# Altium PCB PCB_GTV3.3.PcbDoc (part 9 of 11)
Units mil, origin at the board's own origin, x right, y up, seen from the top; angles counter-clockwise.
Board outline 8070.87 x 4881.89 mil, 4 copper layers (Top Layer, GND, PWR, Bottom Layer), stack 61.653 mil thick; 464 components, 293 nets, 1458 pads, 748 vias.
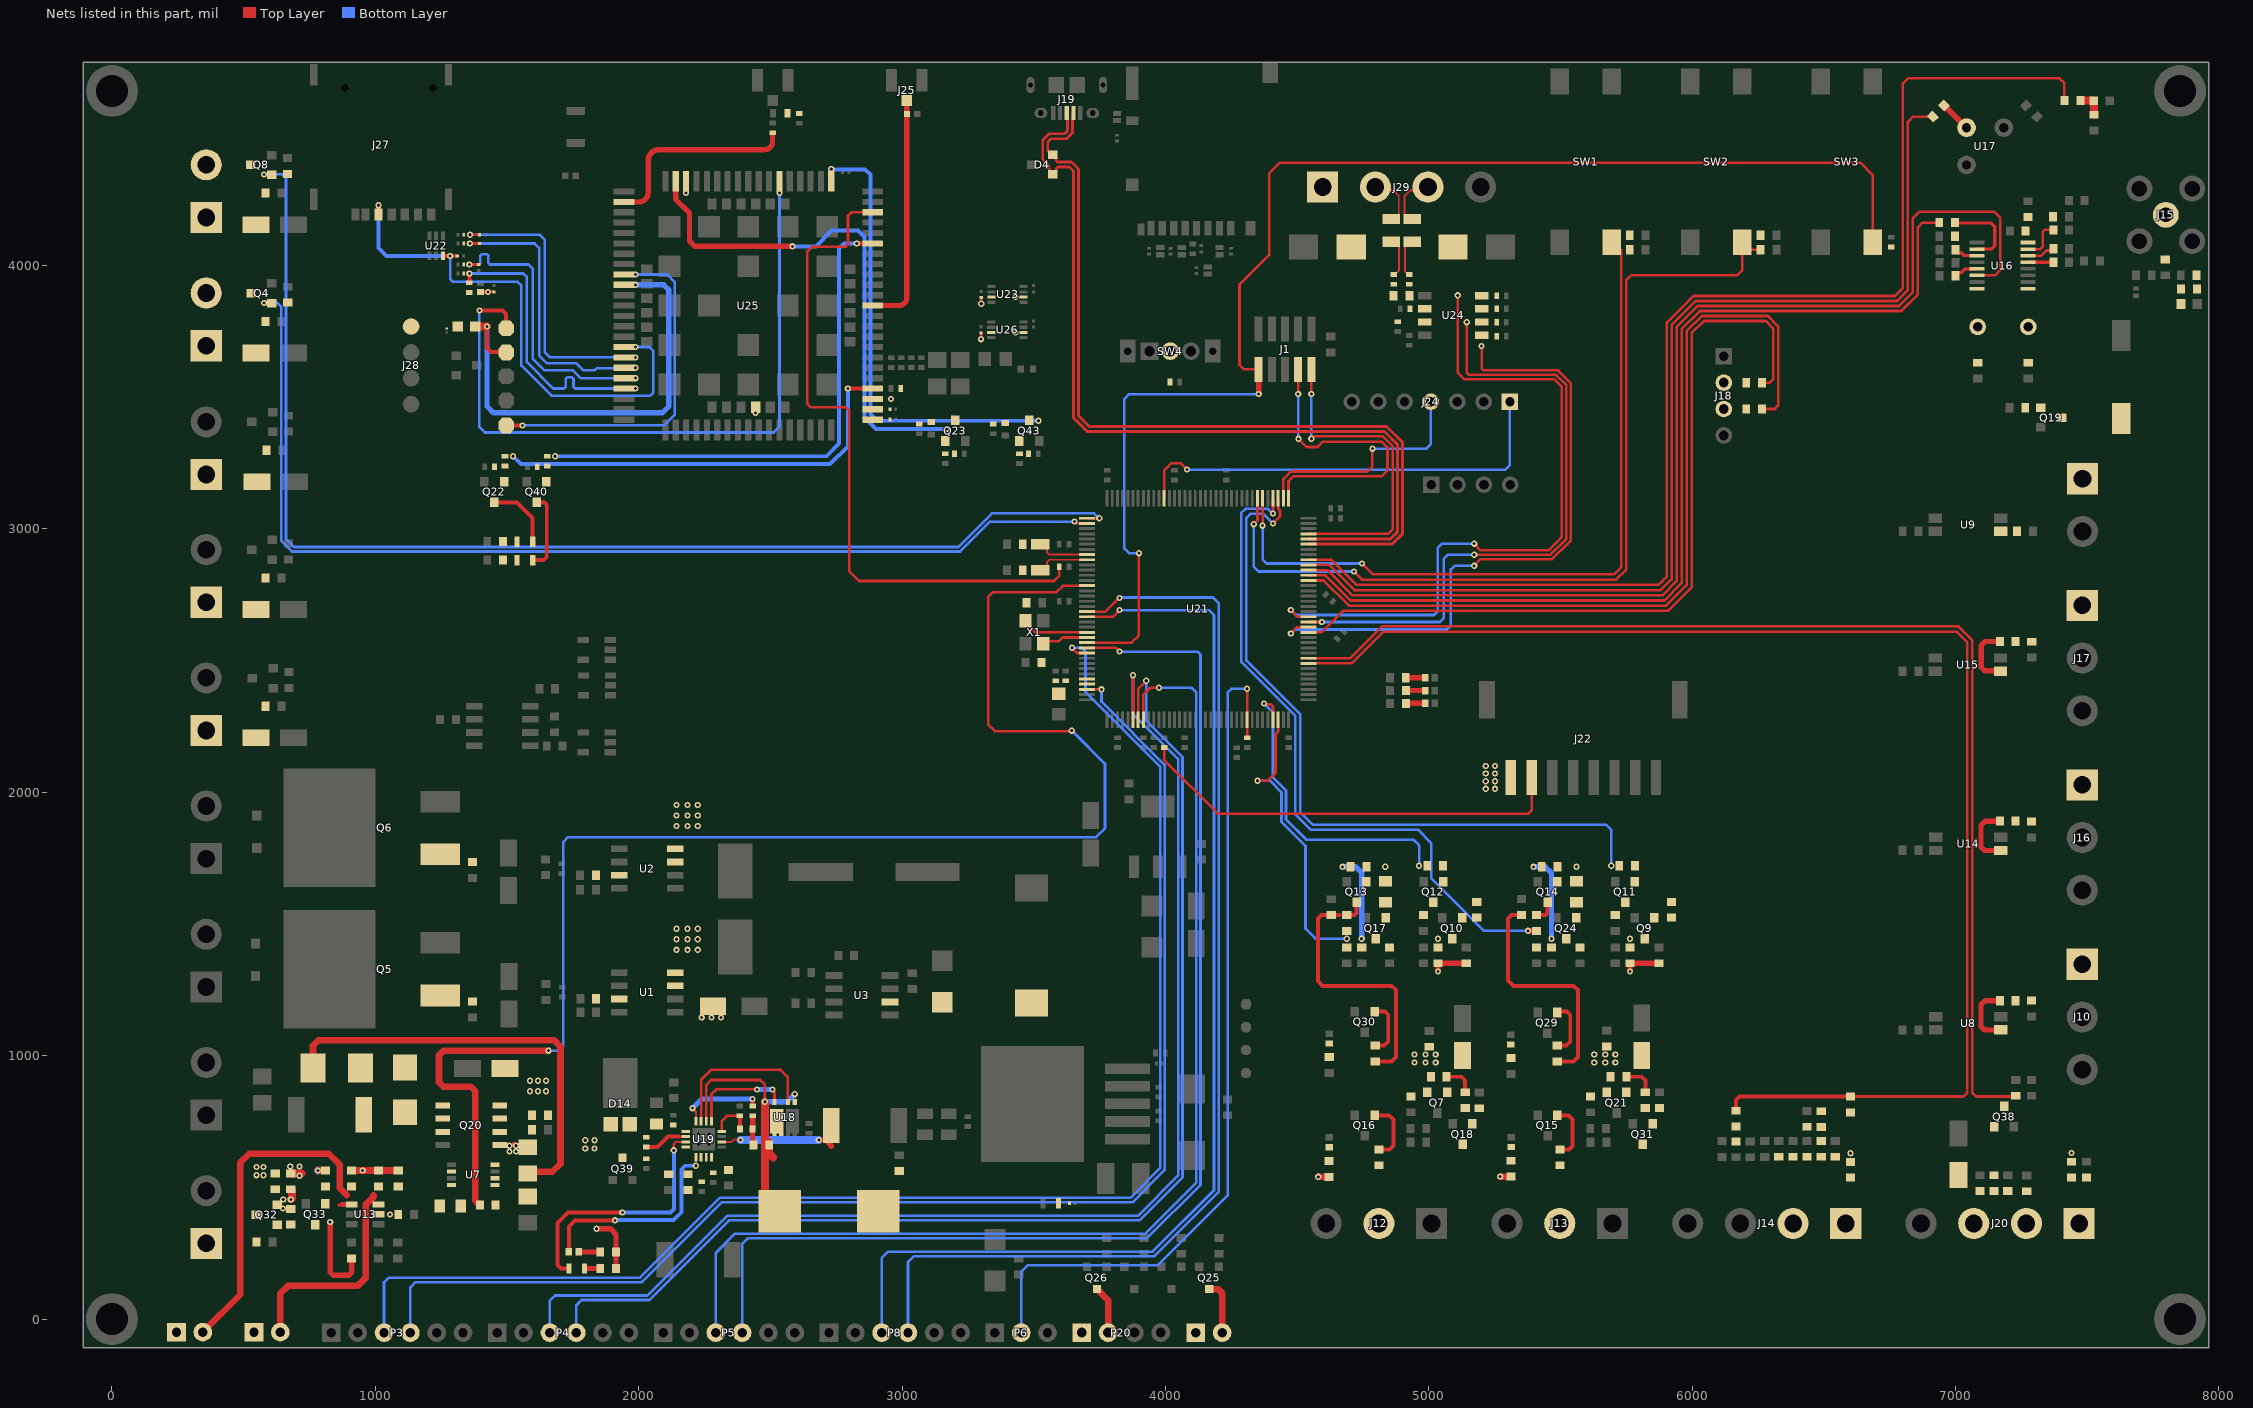
[diagram p6: the nets of this part, all layers, seen from the top]

## Via types
v1: diameter 23.62, hole 11.81, Top Layer to Bottom Layer, tented both sides, 422 vias
v2: diameter 23.62, hole 11.81, Top Layer to Bottom Layer, 326 vias

## Nets (pads, with @x,y where several pads share a name; then routed paths per layer and width w, separated by ;. In a path a pad name is that pad's centre, name@x,y a point inside that pad or via, vN(x,y) a via of type N, cw(c..) or ccw(c..) an arc to the next point about the centre after c; other vN are vias at no path point) (continued)
NetC70_1: C70.1 U16.13 | length 94
  Top Layer w12: C70.1@6998.87,3961.03 6998.87,3963.53 7007.87,3972.53 7021.13,3972.53 7036.13,3987.53 U16.13@7080.43,3987.53
NetC77_2: C77.2 SB16.1
NetC79_2: C79.2 R114.1 R115.2
NetC80_1: C80.1 D15.1 U19.12 | length 167.2
  Top Layer w10: U19.12@2315.54,712.36 2315.54,752.76 2334.32,771.53 C80.1@2383.87,771.53 C80.1@2384.5,770.91 ; D15.1@2384.5,721.99 D15.1@2385.12,721.36
  Top Layer w15: D15.1@2384.5,721.99 C80.1@2384.5,770.91
NetC81_2: C81.2 R119.2 U19.1
NetC82_1: C82.1 D15.2 R121.2 | length 104.1
  Top Layer w20: R121.2@2432.75,763.17 2432.56,762.98 2432.56,721.55 D15.2@2432.37,721.36 2432.37,664.05 C82.1@2435.75,660.67
NetC87_1: C87.1 L5.2 R120.2 U19.10 | length 499
  Top Layer w8: U19.10@2315.54,672.99 2352.86,672.99 2361.07,681.19 2385.18,681.19 v2(2386.82,679.56)
  Top Layer w10: R120.2@2704.3,678.11 2730.79,704.61 R120.2@2730.79,734.67
  Top Layer w20: v2(2683.9,679.56) 2709.3,679.56 2730.79,658.06 2730.79,654.82
  Bottom Layer w30: v2(2386.82,679.56) v2(2683.9,679.56)
NetC96_1: C96.1 U25.90 | length 779.9
  Top Layer w20: U25.90@1943.82,4241.74 2000.59,4241.74 ccw(c2000.59,4277.02) 2014.37,4244.54 ccw(c2000.59,4277.02) 2033.06,4263.23 ccw(c2000.59,4277.02) 2035.87,4277.02 2035.87,4398.49 cw(c2077.5,4398.49) 2077.5,4440.13 2477.87,4440.13 ccw(c2477.87,4470.39) 2508.13,4470.39 C96.1@2508.13,4503.29
NetD1_1: D1.1 L2.1 U3.2
NetD5_2: D5.2 F2.1 R63.2 | length 154.1
  Top Layer w7: F2.1@4857.92,4090.24 4870.81,4090.24 4887,4074.05 4887,3982.37 4870.67,3966.03 R63.2@4867.17,3966.03
NetD6_2: D6.2 D7.2
NetD8_2: D8.2 F3.1 R87.2 | length 152.9
  Top Layer w7: R87.2@4925.54,3966.03 4922.04,3966.03 4909.07,3979 4909.07,4075.55 4923.76,4090.24 F3.1@4937.54,4090.24
NetD17_2: D17.2 F1.2 J28.1
NetJ14_1: J14.1 SB5.2
NetJ14_2: J14.2 SB35.2 SB36.2
NetJ15_1: J15.1 SB4.2
NetJ18_2: J18.2 SB19.2
NetJ18_3: J18.3 SB20.2
NetJ20_2: J20.2 R21.1
NetL6_1: L6.1 R143.2
NetLED1_2: LED1.2 R14.2 | length 73.7
  Top Layer w12: R14.2@4912.36,2435.03 R14.2@4912.79,2434.6 ; LED1.2@4985.23,2434.6 LED1.2@4985.66,2434.16
  Top Layer w20: R14.2@4912.79,2434.6 LED1.2@4985.23,2434.6
NetLED2_2: LED2.2 R15.2 | length 72.9
  Top Layer w12: R15.2@4912.86,2386.27 R15.2@4912.94,2386.18 ; LED2.2@4985.58,2386.18 LED2.2@4985.66,2386.1
  Top Layer w20: R15.2@4912.94,2386.18 LED2.2@4985.58,2386.18
NetLED3_2: LED3.2 R17.2 | length 73
  Top Layer w10: R17.2@4912.86,2337.5 R17.2@4913.39,2338.03
  Top Layer w20: R17.2@4913.39,2338.03 LED3.2@4985.66,2338.03
NetLED4_1: LED4.1 R50.1
NetLED5_1: LED5.1 R51.1
NetLED6_1: LED6.1 R93.1
NetLED7_1: LED7.1 R94.1
NetLED8_2: LED8.2 R53.2 SB3.1 | length 96.3
  Top Layer w30: SB3.1@7477.87,4628.03 7479.51,4626.4 LED8.2@7525.45,4626.4 ; R53.2@7525.38,4572.53 LED8.2@7525.38,4620.55
NetLED9_1: LED9.1 R126.1 | length 59.5
  Top Layer w20: LED9.1@1794.4,192.03 R126.1@1853.87,192.03
NetLED9_2: LED9.2 U19.3 | length 968.1
  Top Layer w8: v2(2133.25,640.7) 2133.25,665.32 2140.91,672.99 U19.3@2177.75,672.99
  Top Layer w15: LED9.2@1735.34,192.03 1704.87,192.03 1690.87,206.03 1690.87,364.03 1731.5,404.67 v2(1937.9,404.67)
  Bottom Layer w15: v2(1937.9,404.67) 2120.12,404.67 2133.25,417.79 v2(2133.25,640.7)
NetLED10_1: LED10.1 R128.1 | length 81.3
  Top Layer w20: LED10.1@1772.57,255.03 R128.1@1853.87,255.03
NetLED10_2: LED10.2 U19.5 | length 769
  Top Layer w7: v2(2216.97,582.06) v2@2217.05,582.13 ; U19.5@2217.05,613.86 U19.5@2217.12,613.93
  Top Layer w15: LED10.2@1735.17,255.03 1735.17,351.7 1758.42,374.95 v2(1909.69,374.95)
  Bottom Layer w15: v2(1909.69,374.95) 1910.1,375.36 2131.45,375.36 2161.67,405.58 2161.67,567.62 2176.11,582.06 v2(2216.97,582.06)
NetLED11_1: LED11.1 R132.1
NetLED12_1: LED12.1 R137.1
NetLED12_2: LED12.2 Q40.3 | length 299.4
  Top Layer w15: LED12.2@1597.4,2881.6 1638.43,2881.6 1650.87,2894.03 1650.87,3092.24 1642.08,3101.03 Q40.3@1611.98,3101.03
NetLED13_1: LED13.1 R145.1
NetLED13_2: LED13.2 Q22.3 | length 260.6
  Top Layer w15: Q22.3@1451.22,3101.03 1538.34,3101.03 1597.4,3041.97 LED13.2@1597.4,2952.03
NETLIGHT: R141.1 U25.52 | length 1625.9
  Top Layer w10: v1(2794,3533) v1@2794.04,3533.04 ; U25.52@2888.67,3533.04 U25.52@2888.7,3533.07
  Top Layer w15: v1@2794.04,3533.04 U25.52@2888.67,3533.04
  Bottom Layer w15: v2(1522.87,3275.9) 1552.73,3246.03 2726.97,3246.03 2794,3313.06 v1(2794,3533)
NetLS1_2: LS1.2 Q19.3
NetQ5_1: Q5.1 R24.1
NetQ6_1: Q6.1 R25.1
NetQ7_1: Q7.1 R27.1 R29.1 | length 120.8
  Top Layer w15: R27.1@5067.64,920.03 5123.87,920.03 5137.87,906.03 R29.1@5137.87,861.31
NetQ9_1: Q9.1 R42.1
NetQ10_1: Q10.1 R44.1
NetQ11_1: Q11.1 R46.1
NetQ11_3: Q11.3 R42.2 R43.1
NetQ12_1: Q12.1 R47.1
NetQ12_3: Q12.3 R44.2 R45.1
NetQ13_1: Q13.1 R52.1
NetQ14_1: Q14.1 R56.1
NetQ15_1: Q15.1 R89.2 | length 224.2
  Top Layer w15: Q15.1@5481.27,773.62 5530.1,773.62 5545.28,758.45 5545.28,657.61 5531.7,644.03 R89.2@5497.87,644.03
NetQ16_1: Q16.1 R90.2 | length 236.9
  Top Layer w15: Q16.1@4794.27,773.62 4848.83,773.62 4865.48,756.97 4865.48,658.94 4850.58,644.03 R90.2@4810.87,644.03
NetQ17_1: Q17.1 R95.1 R97.1
NetQ17_3: Q17.3 R52.2 R86.2 | length 333.1
  Bottom Layer w20: v2(4672.32,1717.03) 4723.87,1717.03 4744.87,1696.03 v2(4744.87,1444.19)
NetQ18_1: Q18.1 R28.2
NetQ18_3: Q18.3 R29.2
NetQ19_1: Q19.1 R62.1
NetQ21_1: Q21.1 R68.1 R107.1 | length 120.8
  Top Layer w15: R68.1@5751.64,920.03 5807.87,920.03 5821.87,906.03 R107.1@5821.87,861.31
NetQ22_1: Q22.1 R141.2 R142.2
NetQ23_1: Q23.1 R154.2 R155.2
NetQ24_1: Q24.1 R96.1 R98.1
NetQ24_3: Q24.3 R56.2 R88.2 | length 327.7
  Bottom Layer w20: v2(5397.06,1717.03) 5442,1717.03 5465.87,1693.17 v2(5465.87,1444.19)
NetQ29_1: Q29.1 R99.2 | length 213.5
  Top Layer w15: Q29.1@5485.27,1167.62 5524.31,1167.62 5536.87,1155.07 5536.87,1054.03 5520.87,1038.03 R99.2@5487.87,1038.03
NetQ30_1: Q30.1 R100.2 | length 213.5
  Top Layer w15: Q30.1@4794.27,1167.62 4833.31,1167.62 4845.87,1155.07 4845.87,1054.03 4829.87,1038.03 R100.2@4796.87,1038.03
NetQ31_1: Q31.1 R33.2
NetQ31_3: Q31.3 R107.2
NetQ32_1: Q32.1 Q33.3 R71.2
NetQ33_1: Q33.1 R81.2
NetQ38_1: Q38.1 R22.1
NetQ39_3: Q39.3 R123.1 R125.2 U19.2 | length 165.1
  Top Layer w8: 2150.62,692.74 U19.2@2177.68,692.74
  Top Layer w15: R123.1@2028.87,653.53 2071.87,653.53 2111.07,692.74 2150.62,692.74
NetQ40_1: Q40.1 R138.2 R139.2
NetQ43_1: Q43.1 R146.1 R147.2
NetR5_1: R5.1 U1.7
NetR8_1: R8.1 U2.7
NetR16_2: R16.2 SW4.2
NetR37_1: R37.1 U14.1 | length 240.8
  Top Layer w20: R37.1@7167.84,1889.82 7111.87,1889.82 7096.87,1874.82 7096.87,1792.03 7109.98,1778.92 U14.1@7172.25,1778.92
NetR39_1: R39.1 U15.1 | length 240.8
  Top Layer w20: R39.1@7168.05,2572.49 7112.08,2572.49 7097.08,2557.49 7097.08,2474.7 7110.19,2461.59 U15.1@7172.46,2461.59
NetR61_1: R61.1 R63.1 R108.1 U24.7
NetR78_1: R78.1 U8.1 | length 240.8
  Top Layer w20: R78.1@7167.84,1208.82 7111.87,1208.82 7096.87,1193.82 7096.87,1111.03 7109.98,1097.92 U8.1@7172.25,1097.92
NetR80_1: R80.1 U9.1
NetR87_1: R87.1 R106.2 R108.2 U24.6
NetR111_1: R111.1 SB37.1
NetR112_2: R112.2 R113.2 R114.2
NetR115_1: R115.1 SB38.1
NetR116_1: R116.1 U17.2 | length 120.4
  Top Layer w22: R116.1@6956.05,4607.62 6956.69,4607.62 7040.92,4523.4 U17.2@7041.56,4523.4
NetR121_1: R121.1 U19.16 | length 322.8
  Top Layer w7: R121.1@2432.44,809.48 R121.1@2432.75,809.17
  Top Layer w8: v2(2204.52,800.67) 2204.52,800.58 2216.92,788.18 U19.16@2216.92,751.92
  Top Layer w15: R121.1@2432.44,809.48 v2(2432.44,835.54)
  Bottom Layer w20: v2(2204.52,800.67) 2239.39,835.54 v2(2432.44,835.54)
NetR122_1: R122.1 R124.1 U19.4
NetR127_1: R127.1 R129.2 U19.8
NetR134_1: R134.1 U25.98 | length 2585.7
  Top Layer w10: U25.98@2888.7,4202.37 2808.17,4202.37 2794.9,4189.09 2794.9,4081.5 2784.34,4070.94 2657.86,4070.94 2640.24,4053.33 2640.24,3474.44 2652.48,3462.21 2785.07,3462.21 2800,3447.28 2800,2838.95 2836.82,2802.13 3576.23,2802.13 3596.86,2822.75 R134.1@3596.86,2856.36
NetR135_1: R135.1 U25.96
NetR140_1: R140.1 U25.95
NetSB7_1: SB7.1 U7.5 | length 3.2
  Top Layer w10: SB7.1@1454.75,435.63 SB7.1@1456.98,433.4
NetSB17_2: SB17.2 U16.5 | length 95.8
  Top Layer w12: U16.5@7275.31,4012.53 U16.5@7275.31,4012.53 7371.02,4012.59 SB17.2@7371.07,4012.64
NetSB18_1: SB18.1 U16.10 | length 302.8
  Top Layer w12: SB18.1@6997.87,4162.03 7134.55,4162.03 7148.87,4147.71 7148.87,4075.7 7135.7,4062.53 U16.10@7080.43,4062.53
NetU18_2: U18.2 U19.15 | length 607.1
  Top Layer w10: U19.15@2236.8,751.73 2236.98,751.9 2236.98,908.64 2274.49,946.16 2538.94,946.16 2565.75,919.34 U18.2@2565.75,824.67
NetU18_4: U18.4 U19.13 | length 391.7
  Top Layer w10: U19.13@2276.17,751.73 2276.17,853.77 2294.44,872.03 v2(2448.87,872.03) ; v2(2507.69,872.03) 2507.69,868.35 2515.57,860.47 U18.4@2515.57,824.67
  Bottom Layer w20: v2(2448.87,872.03) v2(2507.69,872.03)
NRST: C73.2 J1.10 SW3.3 U21.25 | length 5198.2
  Top Layer w10: U21.25@3702.4,2568.08 3871.29,2568.08 3899,2595.79 v1(3899,2908) ; J1.10@4353.87,3606.03 4298.41,3606.03 4281.29,3623.15 4281.29,3927.23 4394,4039.93 4394,4348.82 4435.76,4390.58 6639.42,4390.58 6685.4,4344.6 SW3.3@6685.4,4088.44
  Top Layer w20: v2(4353.87,3511.85) J1.10@4353.87,3606.03
  Bottom Layer w10: v1(3899,2908) 3861.78,2908 3843.85,2925.93 3843.85,3493.5 3862.19,3511.85 v2(4353.87,3511.85)
OSC_IN: C53.2 U21.8 X3.1 | length 240.8
  Top Layer w7: X3.1@3501.22,2941.31 3533.58,2941.31 3549.77,2925.12 3549.77,2911.57 3558.61,2902.73 U21.8@3702.4,2902.73 ; X3.1@3524,2941.31 X3.1@3539.75,2941.31
OSC_OUT: C78.2 U21.9 X3.2 | length 219.5
  Top Layer w7: X3.2@3524,2842.88 X3.2@3539.75,2842.88 ; X3.2@3524.59,2842.88 3534.48,2842.88 3550.67,2859.07 3550.67,2874.88 3558.83,2883.04 U21.9@3702.4,2883.04
OV_UV_EN: R81.1 R82.2 R117.1 R118.1 | length 206.4
  Top Layer w25: v2(782.02,563.98) R81.1@811.04,563.96 ; R117.1@909.82,563.96 v2(951.87,563.96) R118.1@1012.18,563.96 R82.2@1087.14,563.96
PATCH: C77.1 L4.1
PH: C82.2 L5.1 U18.1 U18.5 U19.14 | length 992.5
  Top Layer w10: U19.14@2256.49,751.73 2256.49,889.45 2274.66,907.62 2460.91,907.62 2478.82,889.7 v2(2478.82,825.3)
  Top Layer w30: L5.1@2478.82,460.03 v2(2478.82,825.3) ; C82.2@2495.75,670.36 C82.2@2495.75,660.67 2495.75,628.66 2510.95,613.46
  Bottom Layer w20: v2@2478.78,825.26 2563.95,825.26 v2@2591.86,853.17
  other v2: 2592.56,853.87
PIR_OUT: R116.2 U21.99 | length 4093.6
  Top Layer w10: U21.99@4543.34,2863.36 4621.95,2863.36 4717.7,2767.61 4764.74,2767.61 5879.49,2767.61 5921.87,2809.98 5921.87,3774.5 6012.87,3865.51 6777.91,3865.51 6818.98,3906.58 6818.98,4545.15 6839.03,4565.2 R116.2@6913.63,4565.2
PM_CNTRL: Q4.1 R6.1 U21.2 | length 4085.5
  Top Layer w10: v1(3654.25,3027.96) 3657.93,3027.96 3664.55,3021.35 3701.88,3021.35 U21.2@3702.4,3020.84
  Bottom Layer w10: v1(577.94,3858) 627.81,3858 643,3842.81 643,2954.75 683.31,2914.44 3220.45,2914.44 3333.97,3027.96 v1(3654.25,3027.96)
PROP_MIXING: J8.2 Q4.3
PS_MCU: SB37.2 SB38.2 U21.80 | length 5208.2
  Top Layer w10: U21.80@4543.34,2489.34 4706.58,2489.34 4827.37,2610.13 4912.79,2610.13 7004,2610.13 7044.87,2569.26 7044.87,860.46 7029.44,845.03 SB38.2@6600.87,845.03
  Top Layer w15: SB37.2@6166.74,791.03 6166.74,831.96 6179.81,845.03 SB38.2@6600.87,845.03
PS_PWR: J20.1 SB43.2 SB44.2
PSW_MCU: C40.1 D12.1 J20.3 R22.2 R66.2
PWM_D2: Q38.3 R20.1 U21.81 | length 4481.3
  Top Layer w10: U21.81@4543.34,2509.03 4702.23,2509.03 4823.01,2629.81 4927.36,2629.81 7011.18,2629.81 7063.87,2577.13 7063.87,858.57 7077.4,845.03 R20.1@7228.64,845.03
PWRKEY: C102.2 D19.1 Q43.3 U25.1 | length 1714
  Bottom Layer w15: v1(2731.25,4366.31) 2732.64,4364.92 2859.4,4364.92 2879.38,4344.94 2879.38,3436.94 2905.54,3410.78 v1(3517.53,3410.78)
R_GND: P20.2 Q26.3 | length 183.2
  Top Layer w25: Q26.3@3739.7,114.25 3782.12,71.82 P20.2@3782.12,-51.43
RE/DE/RS485/T: R58.1 R59.1 U21.88 U24.2 U24.3 | length 2414.8
  Top Layer w10: U21.88@4543.34,2646.82 4543.66,2646.51 4593.35,2646.51 v1(4593.67,2646.19) ; v2@5144,3784.9 v2(5143.87,3785.03) 5143.87,3593.95 5153,3584.81 5483.23,3584.81 5522,3546.04 5522,2962.56 5461.44,2902 v1(5172,2902)
  Bottom Layer w10: v1(4593.67,2646.19) 4594.3,2646.82 5042.34,2646.82 5056.94,2661.43 5056.94,2886.96 5071.98,2902 v1(5172,2902)
RESIN_SAVER: J9.2 Q8.3
RF_ANT: D9.2 J25.1 U25.60 | length 895.4
  Top Layer w20: U25.60@2888.7,3848.03 2987.87,3848.03 ccw(c2987.87,3878.15) 3017.98,3878.15 J25.1@3017.98,4627.04
RF_DO: SB18.2 U21.97 | length 3742.3
  Top Layer w10: U21.97@4543.34,2823.99 4607.58,2823.99 4703.33,2728.24 4729.2,2728.24 5893.86,2728.24 5959.87,2794.24 5959.87,3758.76 6028.61,3827.51 6793.65,3827.51 6856.98,3890.84 6856.98,4144.82 6875.2,4163.03 SB18.2@6937.87,4163.03
RF_RSSI: U16.14 U21.98 | length 4303.8
  Top Layer w10: U21.98@4543.34,2843.67 4614.77,2843.67 4710.52,2747.92 5886.68,2747.92 5940.87,2802.11 5940.87,3766.63 6020.74,3846.51 6785.78,3846.51 6837.98,3898.71 6837.98,4180.14 6862.19,4204.36 7146.42,4204.36 7168.87,4181.91 7168.87,3982.4 7149,3962.53 U16.14@7080.43,3962.53
RO1: C71.2 U16.1 X2.1 | length 0.9
  Top Layer w12: U16.1@7275.31,3912.53 U16.1@7275.93,3911.91
RO2: C72.2 U16.16 X2.2 | length 3.7
  Top Layer w12: U16.16@7080.43,3912.53 7082.91,3912.53 U16.16@7083.8,3911.64
RS485/RS232/T.RXD/RS485/RS232/T: R57.1 U21.87 U24.1 | length 2457.5
  Top Layer w10: v1(4476,2603) 4500.14,2627.14 U21.87@4543.34,2627.14 ; v1(5172,2860) 5197,2885 5468.48,2885 5539,2955.52 5539,3553.08 5490.27,3601.81 5207.87,3601.81 5200.37,3609.31 v2(5200.37,3694.53) v2@5201.16,3693.75
  Bottom Layer w10: v1(4476,2603) 4491.21,2618.21 5069.78,2618.21 5083.74,2632.17 5083.74,2846.02 5097.72,2860 v1(5172,2860)
RS485/RS232/T.TXD/RS485/RS232/T: R60.1 U21.89 U24.4 | length 2680.7
  Top Layer w10: v1(4476,2692) 4501.49,2666.51 U21.89@4543.34,2666.51 ; v2@5110,3886.9 v2(5109.87,3887.03) 5109.87,3592.63 5134.69,3567.81 5476.19,3567.81 5505,3539 5505,2969.6 5454.4,2919 5197,2919 v1(5172,2944)
  Bottom Layer w10: v1(4476,2692) 4495,2673 5020.37,2673 5033.49,2686.12 5033.49,2926.93 5050.56,2944 v1(5172,2944)
RS485_N: F2.2 J29.2 | length 209.3
  Top Layer w7: J29.2@4796.87,4298.03 4810.46,4284.44 4866.42,4284.44 4885.87,4265 4885.87,4193.03 4869.68,4176.85 F2.2@4857.92,4176.85
RS485_P: F3.2 J29.3 | length 211
  Top Layer w7: F3.2@4937.54,4176.85 4924.05,4176.85 4907.87,4193.03 4907.87,4265 4927.31,4284.44 4983.28,4284.44 J29.3@4996.87,4298.03
RS_CNTRL: Q8.1 R9.1 U21.1 | length 4667.4
  Top Layer w10: U21.1@3702.4,3040.52 v1(3749,3040.52)
  Bottom Layer w10: v1(576.94,4346) 646.87,4346 661,4331.87 661,2962.2 691.76,2931.44 3213.41,2931.44 3340.97,3059 3729.56,3059 3748.04,3040.52 v1(3749,3040.52)
RST_GSM: C97.2 D16.1 Q23.3 U25.16 | length 1971.9
  Top Layer w20: U25.16@2140.67,4320.48 2140.67,4251.46 2193,4199.13 2193,4093 2213,4073 v1(2584,4073)
  Bottom Layer w15: v1(2584,4073) 2672.66,4073 2732.66,4133 2832.38,4133 2857.38,4108 2857.38,3422.88 2900.5,3379.76 v1(3169.32,3379.76)
RX_D1: SB19.1 U21.86 | length 3071.6
  Top Layer w10: U21.86@4543.34,2607.45 4593.32,2607.45 4674.74,2688.87 4729.2,2688.87 5908.23,2688.87 5997.87,2778.5 5997.87,3743.02 6044.35,3789.51 6279.39,3789.51 6307.5,3761.4 6307.5,3567.89 6295,3555.4 SB19.1@6264.98,3555.4
RX_D2: SB20.1 U21.96 | length 3227.2
  Top Layer w10: U21.96@4543.34,2804.3 4600.4,2804.3 4696.15,2708.55 4715.56,2708.55 5901.05,2708.55 5978.87,2786.37 5978.87,3750.89 6036.48,3808.51 6287.26,3808.51 6326.5,3769.27 6326.5,3468.83 6313.06,3455.4 SB20.1@6264.98,3455.4
RXIN1: R91.2 R101.1 U21.70 | length 1125.5
  Top Layer w10: v1(4349,2044) 4389,2044 4417.59,2072.59 4417.59,2220.24 4427.99,2230.64 U21.70@4427.99,2275.56
  Bottom Layer w10: v1(4349,2044) 4396.37,2044 4440.82,1999.55 4440.82,1887.78 4531.77,1796.83 4531.77,1482.06 4569.64,1444.19 v2(4688.47,1444.19)
RXIN1#: Q13.3 R48.1 R100.1 R101.2 | length 1061.7
  Top Layer w15: R48.1@4623.4,1534.32 4660.87,1534.32 ; R48.1@4629.87,1534.03 4592.4,1534.03 4578.87,1520.51 4578.87,1283.15 4596.98,1265.03 4858.87,1265.03 4874.87,1249.03 4874.87,995.03 4857.87,978.03 R100.1@4796.87,978.03 ; R101.2@4688.47,1534.03 4717.87,1534.03 4725.87,1542.03 Q13.3@4725.87,1582.43
RXIN2: R92.2 R102.1 U21.112 | length 2598.8
  Top Layer w10: v1(4408.3,3059.02) U21.112@4408.3,3116.51
  Top Layer w20: v2(5376.21,1474.03) R102.1@5408.87,1474.03
  Bottom Layer w10: v1@4408.3,3057.3 4389.3,3076.3 4302.97,3076.3 4288.16,3061.5 4288.16,2494.72 4492.83,2290.05 4492.83,1916.33 4551.27,1857.89 4957.99,1857.89 5008.87,1807.01 5008.87,1673.83 5208.67,1474.03 v2(5376.21,1474.03)
RXIN2#: Q14.3 R49.1 R99.1 R102.2 | length 992
  Top Layer w15: R49.1@5351.87,1534.32 5314.4,1534.32 5300.87,1520.79 5300.87,1285.81 5321.64,1265.03 5549.87,1265.03 5565.87,1249.03 5565.87,995.03 5548.87,978.03 R99.1@5487.87,978.03 ; R102.2@5413.21,1534.03 5442.61,1534.03 5450.61,1542.03 Q14.3@5450.61,1582.43
S_VIN: D14.1 D14.2 J21.1 R123.2 R126.2 R128.2 | length 212.6
  Top Layer w20: v2(1839.87,343.03) 1840.07,343.24 1892.23,343.24 1913.87,321.61 R128.2@1913.87,255.03 R126.2@1913.87,192.03
  other v2: 1797,648 1832,648 1797,679 1832,679
SCK_NFC: J24.1 U21.133 | length 1687
  Top Layer w10: U21.133@3994.91,3116.51 3994.91,3221.35 4009.78,3236.22 4009.78,3236.47 4022.89,3249.57 4057.78,3249.57 v1(4082,3225.35)
  Bottom Layer w10: v1(4082,3225.35) 5290.23,3225.35 5307.87,3242.98 J24.1@5307.87,3483.03
SEL0: R104.1 SB42.1 U16.7 | length 158.9
  Top Layer w10: U16.7@7275.31,4062.53 7321.6,4062.53 7331.02,4071.95 7331.02,4128.23 7338.05,4135.25 SB42.1@7371.07,4135.25
SEL1: R55.1 SB41.1 U16.11 | length 100.2
  Top Layer w12: R55.1@6998.87,4050.02 7007.87,4050.02 6998.87,4059.02 R55.1@6998.87,4060.03 ; R55.1@7007.87,4049.02 7007.87,4048.83 7021.62,4048.83 7032.91,4037.53 U16.11@7080.43,4037.53
SHDN: R64.2 SB7.2 U21.14 | length 5661.3
  Top Layer w10: v1(3644.11,2234.11) 3642.22,2232.22 3352.81,2232.22 3327,2258.03 3327,2741.64 3345.23,2759.87 3586.62,2759.87 3610.86,2784.11 3701.88,2784.11 U21.14@3702.4,2784.62
  Top Layer w25: SB7.2@1396.98,433.4 1395.87,433.4 1379.87,449.4 1379.87,865.03 1362.87,882.03 1258.86,882.03 1241.87,899.02 1241.87,1002.03 1258.87,1019.03 v2(1657.87,1019.03)
  Bottom Layer w10: v2(1657.87,1019.03) 1694.87,1019.03 1713.87,1038.03 1713.87,1811.76 1732.1,1830 3736.86,1830 3770.3,1863.44 3770.3,2108.1 v1@3644.2,2234.2
SHDN#: C75.1 R105.2 U16.8
SIM_CD: R144.2 R152.2 U25.34 | length 1107.3
  Top Layer w15: R144.2@1356.87,3935.03 v1(1356.88,3970.03)
  Bottom Layer w10: v1(1356.88,3970.03) 1561.01,3970.03 1575.06,3955.99 1575.06,3633.41 1675.42,3533.05 1711.38,3533.05 1716.38,3533.05 1722.38,3539.05 1722.38,3569.59 1728.38,3575.59 1746.38,3575.59 1752.38,3569.59 1752.38,3539.05 1758.38,3533.05 1829.93,3533.05 v1(1988.26,3533.05)
SIM_CLK: C99.2 R151.2 U25.32 | length 1108.6
  Top Layer w10: R151.2@1335.69,4083.41 R151.2@1335.73,4083.45 ; v1@1358.55,4083.72 1358.87,4084.03 1358.96,4083.94 C99.2@1394.96,4083.94 ; v1(1358.87,4083.5) v1(1358.87,4083.5)
  Bottom Layer w10: v1(1358.87,4083.5) 1605.02,4083.5 1621.72,4066.8 1621.72,3658.83 1651.99,3628.56 1763.16,3628.56 1789.72,3602 1833,3602 1841.72,3610.72 1987.19,3610.72 v1(1988.26,3611.79)
SIM_DATA: C98.2 R153.2 U25.31 | length 1108.3
  Top Layer w10: v1(1358.96,4117.12) C98.2@1394.96,4117.12
  Bottom Layer w10: v1(1358.96,4117.12) 1623.95,4117.12 1643.02,4098.05 1643.02,3671.22 1663.04,3651.2 v1(1988.26,3651.16)
SIM_RST: C100.2 R150.2 U25.33 | length 1110.3
  Top Layer w10: v1(1356.88,4004.03) C100.2@1392.87,4004.03
  Bottom Layer w10: v1(1356.88,4004.03) 1388,4004.03 1393,4004.03 1399,4010.03 1399,4037.37 1405,4043.37 1423,4043.37 1429,4037.37 1429,4010.03 1435,4004.03 1440.99,4004.03 1580.82,4004.03 1598.12,3986.74 1598.12,3646.11 1642.23,3602 1750.02,3602 1779.6,3572.42 v1(1988.26,3572.42)
SIM_VDD: C101.1 J27.C1 U22.6 U25.30 | length 1995.4
  Top Layer w10: J27.C1@1011.87,4193.96 J27.C1@1011.93,4193.9 ; v2(1284.15,4036.05) 1284.55,4036.45 1307.14,4036.45 C101.1@1307.54,4036.85
  Top Layer w15: U22.6@1256.46,4036.85 1256.83,4036.45 1283.75,4036.45 v2(1284.15,4036.05)
  Top Layer w20: J27.C1@1011.87,4193.96 v2(1011.87,4229.03)
  Bottom Layer w10: v2(1284.15,4036.05) 1284.15,3948.8 1294.98,3937.97 1539.88,3937.97 1554.44,3923.41 1554.44,3620.32 1668.76,3506 2044.04,3506 2055.52,3517.48 2055.52,3676.49 2041.48,3690.53 v1(1988.26,3690.53)
  Bottom Layer w15: v2@1011.87,4234.03 v2(1011.87,4229.03) 1011.87,4067.03 1042.85,4036.05 v2(1284.15,4036.05)
SNS_IN: SB3.2 U21.100 | length 4799.7
  Top Layer w10: U21.100@4543.34,2883.04 4629.37,2883.04 4724.09,2788.33 5873.34,2788.33 5902.87,2817.85 5902.87,3782.37 6005,3884.51 6770.04,3884.51 6799.98,3914.45 6799.98,4691.15 6819.86,4711.03 7394.87,4711.03 7412.87,4693.03 7412.87,4633.03 SB3.2@7417.87,4628.03
SPI_NFC.SS_NFC: J24.4 U21.110 | length 888.8
  Top Layer w10: U21.110@4447.67,3116.51 4447.67,3189.45 4476.22,3218 4767,3218 4785.6,3236.6 v1(4785.6,3304.83)
  Bottom Layer w10: v1(4785.6,3304.83) 4990.27,3304.83 5007.87,3322.44 J24.4@5007.87,3483.03
SQ: SB6.1 U16.6 | length 106.6
  Top Layer w10: U16.6@7275.31,4037.53 7325.57,4037.53 7345.01,4056.97 7364.4,4056.97 SB6.1@7371.07,4063.64
STATUS: R138.1 U25.66 | length 1975.5
  Top Layer w15: v1(2828.03,4083.4) 2828.46,4083.83 2866.05,4083.83 2866.48,4084.25 U25.66@2888.7,4084.25
  Bottom Layer w15: v2(1682.87,3275.9) 2712.73,3275.9 2760.61,3323.77 2760.61,4064.9 2779.96,4084.25 2827.18,4084.25 v1(2828.03,4083.4)
SW_1: C37.2 R18.1 SW1.3 U21.114 | length 2834.1
  Top Layer w10: v1(4368.93,3012.49) U21.114@4368.93,3116.51 ; v1(4746.39,2868.87) 4787.97,2827.29 4795.29,2827.29 5703.13,2827.29 5729.92,2854.09 5729.92,4060.4
  Bottom Layer w10: v1(4368.93,3012.49) 4368.93,2884.44 4384.5,2868.87 v1(4746.39,2868.87)
SW_2: C38.2 R19.1 SW2.3 U21.115 | length 3482.2
  Top Layer w10: v1(4335.07,3018) 4349.25,3032.17 U21.115@4349.25,3116.51 ; v1(4715.56,2838.16) 4746.39,2807.33 5213.47,2807.33 ; 5213.5,2807.29 5711.41,2807.29 5749.92,2845.8 5749.92,3945.09 5768.54,3963.7 6171.59,3963.7 6189.63,3981.74 SW2.3@6189.63,4060.4 ; SW2.3@6189.63,4088.44 SW2.3@6189.63,4063.83 ; SW2.3@6214.23,4088.44 SW2.3@6189.63,4063.83 ; C38.2@6259.27,4060.4 SW2.3@6189.63,4060.4 ; SW2.3@6189.63,4060.4 SW2.3@6189.63,4063.83
  Bottom Layer w10: v1(4335.07,3018) 4335.07,2856.72 4353.63,2838.16 v1(4715.56,2838.16)
SWCLK: J1.4 U21.109 | length 1179.5
  Top Layer w10: U21.109@4467.36,3116.51 4467.36,3182.71 4484.64,3200 4820.43,3200 4843,3222.57 4843,3309.67 4821.03,3331.64 4598.47,3331.64 4578.02,3311.19 4535.81,3311.19 v1(4505,3342) ; v1(4503.87,3511.85) J1.4@4503.87,3606.03
  Top Layer w25: J1.4@4503.87,3606.03 J1.4@4504.68,3605.22
  Bottom Layer w10: v1(4503.87,3511.85) 4504.43,3511.28 4504.43,3342.57 v1(4505,3342)
SWDIO: J1.2 U21.105 | length 1233.8
  Top Layer w10: U21.105@4543.34,2981.47 4845.43,2981.47 4862.43,2998.46 4862.43,3314.28 4824.33,3352.38 4566.54,3352.38 4556.73,3342.57 v2(4553.87,3342.57) ; v1(4553.87,3511.85) J1.2@4553.87,3606.03
  Bottom Layer w10: v2(4553.87,3342.57) v1(4553.87,3511.85)
TDS_1: P3.4 U21.34 | length 5199
  Top Layer w10: U21.34@3702.4,2390.92 v1(3757,2390.92)
  Bottom Layer w10: P3.4@1133.12,-51.43 1133.12,120.29 1153.18,140.35 2011.97,140.35 2314.66,443.03 3873.99,443.03 3996.87,565.91 3996.87,2104.58 3757,2344.44 v1(3757,2390.92)
TDS_2: P3.3 U21.27 | length 5519.6
  Top Layer w10: v1(3644.78,2548.77) 3664.84,2528.71 U21.27@3702.4,2528.71
  Bottom Layer w10: P3.3@1033.12,-51.43 1033.12,139.29 1051.18,157.35 2004.93,157.35 2307.62,460.03 3866.95,460.03 3979.87,572.95 3979.87,2097.53 3696.16,2381.24 3696.16,2534.86 3682.25,2548.77 v1(3644.78,2548.77)
TDS_3: P4.4 U21.43 | length 4709.8
  Top Layer w10: U21.43@3896.49,2275.56 3896.49,2392.71 v1(3927.15,2423.37)
  Bottom Layer w10: P4.4@1762.87,-51.43 1762.87,52.04 1783.18,72.35 2040.14,72.35 2342.83,375.03 3902.16,375.03 4064.87,537.74 4064.87,2133.95 3927.15,2271.67 v1(3927.15,2423.37)
TDS_4: P4.3 U21.42 | length 4842.5
  Top Layer w10: U21.42@3876.8,2275.56 v1(3876.8,2444.46)
  Bottom Layer w10: P4.3@1662.87,-51.43 1662.87,70.03 1682.18,89.35 2033.1,89.35 2335.78,392.03 3895.12,392.03 4047.87,544.78 4047.87,2120.96 4047.87,2126.91 3876.8,2297.97 v1(3876.8,2444.46)
TDS_5: P5.4 U21.26 | length 4624.2
  Top Layer w10: U21.26@3702.4,2548.4 3811.83,2548.4 v1(3826,2534.22)
  Bottom Layer w10: P5.4@2392.62,-51.43 2392.62,284.27 2415.39,307.03 3930.33,307.03 4133.22,509.93 4133.22,2522.96 4121.95,2534.22 v1(3826,2534.22)
TDS_6: P5.3 U21.44 | length 4413.2
  Top Layer w10: U21.44@3916.17,2275.56 3916.17,2370.93 3942.25,2397 v1(3975,2397)
  Bottom Layer w10: P5.3@2292.62,-51.43 2292.62,251.79 2364.87,324.03 3923.28,324.03 4116.22,516.97 4116.22,2128 4116.22,2380.38 4099.6,2397 v1(3975,2397)
TDS_7: P8.4 U21.19 | length 4323.6
  Top Layer w10: U21.19@3702.4,2686.19 3771.47,2686.19 3823.34,2738.06 v1(3825.91,2738.06)
  Bottom Layer w10: P8.4@3022.37,-51.43 3022.37,216.01 3045.39,239.03 3958.49,239.03 4201.87,482.41 4201.87,2128 4201.87,2718.13 4180.26,2739.74 3827.59,2739.74 v1(3825.91,2738.06)
TDS_8: P8.3 U21.20 | length 4335.4
  Top Layer w10: U21.20@3702.4,2666.51 3800.8,2666.51 v1(3826,2691.7)
  Bottom Layer w10: P8.3@2922.37,-51.43 2922.37,230.97 2947.43,256.03 3951.45,256.03 4184.52,489.11 4184.52,2128 4184.52,2672.48 4165.3,2691.7 v1(3826,2691.7)
TDS_IN.TEMP_SNS: P6.2 R31.2 U21.64 | length 3310
  Top Layer w10: R31.2@4309.88,2207.5 U21.64@4309.88,2275.56 v1(4309.88,2393)
  Bottom Layer w10: P6.2@3452.12,-51.43 3452.12,179.22 3477.54,204.64 3972.18,204.64 4235.87,468.33 4235.87,2128 4235.87,2378.73 4250.14,2393 v1(4309.88,2393)
TXIN1: R47.2 U21.69 | length 1186.9
  Top Layer w10: v1(4374.44,2337.2) 4377.05,2334.6 4399.23,2334.6 4408.3,2325.53 U21.69@4408.3,2275.56
  Bottom Layer w10: v1(4374.44,2337.2) 4408.3,2303.35 4408.3,2056.11 4457.82,2006.59 4457.82,1897.61 4535.53,1819.89 4942.25,1819.89 4963.06,1799.08 v2(4963.06,1721.03)
TXIN2: R46.2 U21.111 | length 2779.5
  Top Layer w10: v1(4408.3,3020.84) 4435.11,3047.65 4435.11,3070.13 4427.99,3077.25 U21.111@4427.99,3116.51
  Bottom Layer w10: v1(4408.3,3020.84) 4371.84,3057.3 4322.62,3057.3 4307.16,3041.84 4307.16,2499.76 4511.83,2295.09 4511.83,1924.2 4559.14,1876.89 5672.86,1876.89 5692.69,1857.05 v2(5692.69,1721.03)
UART_LOG_TX: P12.1 U25.23 | length 1321.1
  Top Layer w15: P12.1@1497,3393 v1(1558.43,3393)
  Bottom Layer w10: v1(1558.43,3393) 2096.14,3393 2136.52,3433.38 2136.52,3938.48 2108.88,3966.12 v1(1988.26,3966.12)
USB_BOOT: P2.1 U25.6 | length 2648.3
  Top Layer w10: P2.1@1496.26,3762.39 P2.1@1497,3761.64
  Top Layer w15: v1(1395,3829) 1483.26,3829 1496.26,3816 P2.1@1496.26,3762.39
  Bottom Layer w10: v1(1395,3829) 1395,3386.7 1415.51,3366.19 2512.2,3366.19 2534.35,3388.33 v1(2534.35,4276.03)
USB_D_N: D4.2 J19.2 U21.103 | length 3299
  Top Layer w11: J19.2@3650.98,4579.07 3648.21,4576.31 3648.21,4552.08 3647.68,4551.56 3647.68,4505.92 3647.68,4505.17 3624.14,4481.63 3565.4,4481.63 3553.14,4469.38 3553.14,4436.78 3559.61,4430.31 3563.54,4430.31 3583.86,4409.99 3583.86,4399.18 3590.31,4392.73 3643.54,4392.73 3669.5,4366.78 3669.5,3429.96 3710.58,3388.88 4839.45,3388.88 4900.63,3327.7 4900.63,2981.64 4861.43,2942.44 4568.88,2942.44 4568.54,2942.1 U21.103@4543.34,2942.1
USB_D_P: D4.1 J19.3 U21.104 | length 3318.7
  Top Layer w11: J19.3@3625.39,4579.07 3628.16,4576.31 3628.16,4552.08 3628.68,4551.56 3628.68,4513.79 3628.68,4513.04 3616.27,4500.63 3557.53,4500.63 3534.14,4477.25 3534.14,4402.97 3558.64,4378.47 3558.64,4356.47 3569.29,4345.83 3573.22,4345.83 3583.86,4356.47 3583.86,4367.29 3590.31,4373.73 3635.67,4373.73 3650.5,4358.91 3650.5,3422.09 3702.71,3369.88 4831.58,3369.88 4881.63,3319.83 4881.63,2989.51 4853.56,2961.44 4568.88,2961.44 4568.54,2961.78 U21.104@4543.34,2961.78
USB_VBUS: F1.1 P15.1 U25.24 | length 1795.2
  Top Layer w10: P15.1@1496.26,3671 P15.1@1497,3670.26
  Top Layer w15: v2(1423.94,3768.61) 1423.94,3687.06 1440,3671 P15.1@1496.26,3671
  Top Layer w30: F1.1@1380.06,3768.61 v2(1423.94,3768.61)
  Bottom Layer w20: v2(1423.94,3768.61) 1423.94,3466.01 1449.19,3440.76 2089.24,3440.76 2114.52,3466.05 2114.52,3907.33 2095.11,3926.75 v1(1988.26,3926.75)
VCC: C24.1 C25.1 C43.1 C45.1 C46.1 C47.1 C58.1 C59.1 C61.1 C62.1 C63.1 C64.1 C65.1 C66.1 C67.1 C68.1 J5.1 J6.1 J7.1 J8.1 J9.1 J10.1 J11.1 J16.1 J17.1 J22.7 J22.8 J29.1 P19.1 P20.1 Q7.2 Q21.2 R12.2 R27.2 R36.2 R37.2 R38.2 R39.2 R40.2 R41.2 R50.2 R51.2 R68.2 R77.2 R78.2 SB2.1 SB5.1 SB8.1 SB40.2 SB44.1 U1.3 U1.4 U2.3 U2.4 | length 2016.5
  Top Layer w10: R12.2@3994.91,2170.5 3994.91,2123.1 4199.38,1918.63 5378.32,1918.63 5390.17,1930.48 J22.7@5390.17,2056.03 ; R51.2@4621.15,540 R51.2@4621.23,539.92
  Top Layer w20: v1(5035,1320) R41.2@5035.03,1351.03 ; R41.2@5035.03,1351.03 C47.1@5142.11,1351.03 ; v1(5763.84,1320) R40.2@5763.87,1351.03 ; R40.2@5763.87,1351.03 C46.1@5870.95,1351.03
  Top Layer w25: v1(4580,540) R51.2@4621.15,540 ; v1(5270.71,540.92) R50.2@5311.87,540.92
  other v1: 1586.98,865.03 1617.48,865.03 1647.98,865.03 1586.98,905.03 1617.48,905.03 1647.98,905.03 4945.94,974.03 4987.41,974.03 5025.91,974.03 5628.17,974.03 5669.64,974.03 5708.14,974.03 4945.94,1004.03 4987.41,1004.03 5025.91,1004.03 5628.17,1004.03 5669.64,1004.03 5708.14,1004.03 2144,1402 2185,1402 2224,1402 2144,1442 2185,1442 2224,1442 2144,1482 2185,1482 2224,1482 2144,1872 2185,1872 2224,1872 2144,1912 2185,1912 2224,1912 2144,1952 2185,1952 2224,1952
  other v2: 6600.76,629.69 7439.87,630.05 5216.03,2013.18 5250.87,2013.18 5216.03,2042.11 5250.87,2042.11 5216.03,2071.03 5250.87,2071.03 5216.03,2099.96 5250.87,2099.96
VCC#12: D11.2 Q32.3 R34.1 SB39.2
  other v1: 2239,1145 2276,1145 2312,1145
  other v2: 575,546 548.4,546.28 575,577 548.4,577.28
VCC#M: D6.1 Q20.1 Q20.2 Q20.3 R64.1 R149.1 U7.2 U7.4
VCC#P: C1.1 C3.1 C56.2 Q20.5 Q20.6 Q20.7 Q20.8 SB9.1 SB40.1 U7.8 | length 54.6
  Top Layer w10: v2@1514.87,658.03 1525.06,668.22
  Top Layer w30: SB9.1@678.87,553.03 v2@719.1,553.03
  other v2: 712.1,544.03 676.82,578.96 712.1,578.96 1509,636 1534.19,636 1508.87,658.03 1534.06,658.03
VCC_M: C69.1 Q32.2 R11.2 R71.1 R82.1 SB9.2 SB39.1 U13.5 | length 376.7
  Top Layer w10: SB9.2@678.87,493.03 SB9.2@682.94,488.96
  Top Layer w20: v2(828.54,368.09) 828.54,177.75 840.26,166.03 899.15,166.03 910.87,177.75 910.87,229.41 R11.2@909.82,230.46
  Top Layer w30: v2@679.14,455.11 682.94,458.91 SB9.2@682.94,488.96
  other v2: 1055.87,397.03 649.92,419.93 650.26,453.96 679.14,453.96
VDD_EXT: C27.1 C94.1 C103.1 C105.1 D27.2 R144.1 U23.3 U23.6 U25.15 U25.97 U25.116 U26.3 U26.6 | length 119.2
  Top Layer w10: D27.2@1399.75,3899.8 D27.2@1399.84,3899.9 ; v1@1427.9,3899.9 1428.09,3900.09 1449.91,3900.09 C27.1@1450,3900.19 ; v1(2443.82,3440.55) U25.116@2443.82,3462.21 ; v1(3300,3720.6) C105.1@3300,3744.19 ; v1(3300.41,3854.78) C103.1@3300.41,3878.37
  Top Layer w15: D27.2@1399.84,3899.9 v1@1427.9,3899.9
  other v1: 2958.32,3493.7 3430.11,3746.19 3430.11,3880.37 1428,3900 2180.02,4276.03
VDDA: C7.1 C113.1 L1.2 U21.32 U21.33
VOUT_A: P27.1 P27.2 R117.2 U13.1 | length 1275
  Top Layer w10: 861.87,432.83 861.87,433.46
  Top Layer w20: 873.58,434.59 909.38,434.59 U13.1@909.82,435.03
  Top Layer w25: P27.2@345.12,-49.43 487.22,92.67 487.22,594.25 521,628.03 822.87,628.03 864.58,586.33 864.58,498.19 891.87,470.89
VOUT_B: P28.1 P28.2 R118.2 U13.6 | length 821.8
  Top Layer w25: P28.2@639.12,-49.43 639.12,96.84 668.32,126.03 932.75,126.03 964.25,157.53 964.25,435.21 993.05,464.01 993.05,470.89
VREF: C86.2 R122.2 U19.6 U19.7
VSS: C56.1 D7.1 R65.2 U7.6 | length 1627
  Top Layer w25: D7.1@763.32,954.03 763.32,1037.48 784.87,1059.03 1677.87,1059.03 1703.02,1033.88 1703.02,590.02 1672.03,559.03 1584.62,559.03 C56.1@1577.98,552.4
W_LED: P19.2 Q25.3 | length 205.5
  Top Layer w25: Q25.3@4166.11,114.25 4166.74,113.61 4200,113.61 4215.12,98.5 P19.2@4215.12,-51.43
WBUS1: J12.2 Q10.3 R41.1 R90.1 R95.2
  other v2: 5035.03,1444.19 4834.31,1717.53
WBUS2: J13.2 Q9.3 R40.1 R89.1 R96.2
  other v2: 5763.87,1444.19 5560.87,1717.53
XIN: C34.2 U21.23 X1.1 | length 259
  Top Layer w10: X1.1@3465.5,2649.26 3468.76,2645.99 3468.76,2645.86 3488.32,2626.31 3488.45,2626.31 3507.3,2607.45 U21.23@3702.4,2607.45 ; X1.1@3468.69,2645.93 X1.1@3468.69,2650.61
XOUT: C35.2 U21.24 X1.3 | length 176.6
  Top Layer w10: X1.3@3535.62,2564 3545.22,2573.59 3595.5,2573.59 3609.67,2587.77 U21.24@3702.4,2587.77
pads on no net: ANT1.2 J1.6 J1.7 J1.8 J19.4 J22.3 J22.6 J27.C6 J27.MH J30.1 J30.8 SW1.2 SW1.4 SW2.2 SW2.4 SW3.2 SW3.4 SW4.MH1 SW4.MH2 U7.3 U7.7 U10.1 U11.1 U12.1 U16.15 U21.11 U21.12 U21.48 U21.49 U21.50 U21.53 U21.57 U21.58 U21.63 U21.90 U21.91 U21.92 U21.106 U21.117 U21.118 U21.119 U21.122 U21.123 U21.124 U21.125 U21.126 U21.127 U21.128 U21.129 U21.132 U25.3 U25.4 U25.5 U25.7 U25.8 U25.11 U25.12 U25.13 U25.14 U25.19 U25.20 U25.21 U25.22 U25.25 U25.26 U25.35 U25.36 U25.37 U25.38 U25.40 U25.41 U25.42 U25.43 U25.44 U25.47 U25.48 U25.49 U25.50 U25.51 U25.53 U25.67 U25.68 U25.100 U25.101 U25.102 U25.103 U25.104 U25.105 U25.106 U25.107 U25.108 U25.109 U25.110 U25.111 U25.112 U25.113 U25.114 U25.115 U25.117 U25.118 U25.119 U25.120 U25.121 U25.122 U25.123 U25.124
copper on no net:
  other v2: 5,-77.16 7857.27,-77.1 -50.91,-58.15 7801.36,-58.09 57.98,-51.08 7910.25,-51.01 -77,-5.16 7775.27,-5.1 77,4.84 7929.27,4.9 -57.98,50.75 7794.29,50.81 50.91,57.82 7903.18,57.88 -5,76.84 7847.27,76.9 4.94,4586.13 7857.21,4586.19 7797.3,4602.21 -50.97,4605.15 57.92,4612.22 7910.19,4612.28 7775.24,4653.79 -77.06,4658.13 76.94,4668.13 7929.21,4668.19 -58.04,4714.04 7794.23,4714.1 50.85,4721.11 7903.12,4721.17 -5.06,4740.13 7847.21,4740.19

## Polygon pours and split planes (outlines as drawn)
VCC_M on Bottom Layer "VCC_M_L04_P041" (solid, pour order 41): 633.4,476.46 714.79,476.46 756.66,434.59 1055.37,434.59 1084.06,405.9 1084.06,366.06 1071,353 640.73,353 627.94,365.8 627.94,471
BAT on Bottom Layer "BAT_L04_P037" (solid, pour order 37): 1590,628.03 1590,687.74 1574.32,703.42 1391.31,703.42 1315.93,628.03 616.97,628.03 593.79,651.21 593.79,777.27 612.52,796 1663.92,796 1767.32,899.4 1941.23,899.4 2119.83,1078 3006,1078 3038,1046 3038,532 3008.52,502.52 2349.87,502.52 2335,517.39 2335,626.24 2351.76,643 2896.08,643 2923,669.92 2923,927 2904,946 2198.91,946 2032.91,780 1851.32,780 1699.35,628.03
VCC#P on Bottom Layer "VCC#P_L04_P040" (solid, remove dead copper, pour order 40): 655.4,609.5 629.97,584.07 629.97,516.03 638.91,507.09 689.87,507.09 749.72,447.24 1527.24,447.24 1554.25,474.25 1554.25,658.12 1529.97,682.4 1399.76,682.4 1326.86,609.5
AGND on Bottom Layer "AGND_L04_P016" (solid, remove dead copper, pour order 16): 2276.33,732.93 2291.54,717.71 2291.54,502.52 2236.8,502.52 2236.8,561.03 2107.76,561.03 2107.76,447.03 1880.87,447.03 1880.87,718.8 1895,732.93
GND on Bottom Layer "GND_L04_P039" (solid, remove dead copper, pour order 39): 0,0 0.1,0.1 0.1,4663.13 7852.1,4663.13 7852.21,4663.03 7852.11,4662.92 7852.11,-0.1 0.1,-0.1
WBUS2 on Bottom Layer "WBUS2_L04_P034" (solid, pour order 34): 5497,1506.36 5497,1444.27 5473.39,1420.66 5409,1420.66 5409,541 5409,293 5428,274 5570,274 5590,294 5590,1347 5601.57,1358.57 5774.41,1358.57 5784.81,1368.98 5784.81,1473.22 5776.03,1482 5590.06,1482 5579.95,1492.11 5581.55,1734.45 5572,1744 5506.67,1744 5497,1734.33
VCC#12 on Bottom Layer "VCC#12_L04_P038" (solid, pour order 38): 589,518 599.11,528.11 599.11,801.31 611.8,814 1656,814 1759,917 1923.32,917 2101.32,1095 2357,1095 2397.42,1135.42 2397.42,1258.58 2382.58,1273.42 1868.42,1273.42 1849,1254 1849,1018.15 1832.85,1002 478,1002 457,981 457,527 466,518
5V on Bottom Layer "5V_L04_P036" (solid, pour order 36): 6036,3429 7806,3429 7848,3387 7848,529 7804,485 7387,485 7344,528 7344,773 7386.57,815.57 7545.57,815.57 7597,867 7597,3266 7570,3293 6036,3293 6019.38,3309.62 6019.38,3412.38
3V3 on Bottom Layer "3V3_L04_P035" (solid, pour order 35): 4526.87,982.13 4558,951 4734,951 4734,912.34 4542.27,912.34 4526.87,896.93 4526.87,825 4526.87,50.87 4460,-16 3477.54,-16 3477.54,162 3520.18,204.64 3599.39,204.64 3686.03,118 4314,118 4351,155 4351,1287 4375,1311 4500,1311 4526.87,1284.13
WBUS1 on Bottom Layer "WBUS1_L04_P032" (solid, pour order 32): 4786.38,1744 4774.1,1731.72 4774.1,1527.1 4722,1473 4722,541 4722,293 4741,274 4883,274 4903,294 4903,1347 4914.57,1358.57 5087.41,1358.57 5097.81,1368.98 5097.81,1473.22 5089.03,1482 4910,1482 4893,1499 4894.53,1731.47 4882,1744
GND on Top Layer "GND_L01_P031" (solid, remove dead copper, pour order 31): 0,0 0.1,0.1 0.1,4663.13 7852.1,4663.13 7852.21,4663.03 7852.11,4662.92 7852.11,-0.1 0.1,-0.1
CRNT_SNS.IP+_1 on Top Layer "CRNT_SNS.IP+_1_L01_P015" (solid, remove dead copper, pour order 15): 1350.87,1517.82 2067.87,1517.82 2067.87,1228.08 2171,1228.08 2171,1152.49 1997.64,1152.49 1997.64,1387.61 1350.87,1387.61
CRNT_SNS.IP+_2 on Top Layer "CRNT_SNS.IP+_2_L01_P029" (solid, remove dead copper, pour order 29): 1350.87,1987.82 2067.87,1987.82 2067.87,1698.08 2171,1698.08 2171,1622.49 1997.64,1622.49 1997.64,1860 1350.87,1860
no net on PWR (split plane): -4.99,-89.34 -89.23,-89.34 -89.23,-5.2 -4.99,-5.2
3V3 on PWR (split plane): 3596.44,210.83 3596.44,-89.34 747.67,-89.34 747.67,73.7 793.65,119.68 2627.24,119.68 2629.69,119.92 2632.05,120.64 2634.22,121.8 2636.12,123.36 2773.24,260.47 3546.79,260.47
VCC on PWR (split plane): 7847.01,4663.13 7847.39,4661.18 7848.5,4659.53 7850.15,4658.42 7852.1,4658.03 7941.44,4658.03 7941.44,4.99 7852.11,4.99 7850.15,4.61 7848.5,3.5 7847.4,1.85 7847.01,-0.1 7847.01,-89.34 3621.56,-89.34 3621.56,216.03 3621.32,218.48 3620.6,220.84 3619.44,223.01 3617.88,224.91 3560.88,281.92 3558.97,283.48 3556.8,284.64 3554.44,285.35 3551.99,285.59 2768.03,285.59 2765.58,285.35 2763.23,284.64 2761.06,283.48 2759.15,281.92 2622.04,144.8 788.45,144.8 786,144.56 783.64,143.85 781.47,142.69 779.57,141.12 726.22,87.78 724.66,85.88 723.5,83.71 722.79,81.35 722.55,78.9 722.55,-89.34 5.2,-89.34 5.2,-0.1 4.81,1.85 3.71,3.5 2.05,4.61 0.1,4.99 -89.23,4.99 -89.23,4658.03 0.1,4658.03 2.05,4658.42 3.71,4659.53 4.81,4661.18 5.2,4663.13 5.2,4752.36 7847.01,4752.36
CRNT_SNS.IP+_2 on PWR (split plane): 916.12,2004.17 918.02,2002.61 920.19,2001.45 922.55,2000.73 925,2000.49 1487.8,2000.49 1510.2,1978.09 1510.2,1701.93 1488.88,1680.61 1101.2,1680.61 946.88,1834.93 944.98,1836.49 942.81,1837.66 940.45,1838.37 938,1838.61 256.72,1838.61 230.56,1864.77 230.56,2036.07 261.5,2067 853.28,2067
no net on PWR (split plane): -4.99,4668.23 -89.23,4668.23 -89.23,4752.36 -4.99,4752.36
S_VIN on PWR (split plane): 1978.44,746.15 1978.44,276.2 1957.8,255.56 567,255.56 564.55,255.32 562.19,254.6 560.02,253.44 558.12,251.88 505.96,199.73 286.12,199.73 267.56,218.29 267.56,360.8 281.9,375.14 696.65,375.14 756.04,315.76 757.94,314.19 760.11,313.03 762.47,312.32 764.92,312.08 1078.64,312.08 1081.09,312.32 1083.44,313.03 1085.62,314.19 1087.52,315.76 1213.6,441.84 1701.4,441.84 1703.85,442.08 1706.2,442.79 1708.37,443.95 1710.28,445.51 1729.88,465.12 1731.44,467.02 1732.6,469.19 1733.32,471.55 1733.56,474 1733.56,750.28 1750.72,767.44 1957.15,767.44
CRNT_SNS.IP+_1 on PWR (split plane): 916.12,1517.12 918.02,1515.56 920.19,1514.4 922.55,1513.68 925,1513.44 1487.8,1513.44 1510.2,1491.04 1510.2,1214.88 1488.88,1193.56 1101.2,1193.56 946.88,1347.88 944.98,1349.44 942.81,1350.6 940.45,1351.32 938,1351.56 256.72,1351.56 230.56,1377.72 230.56,1549.01 261.5,1579.95 853.28,1579.95
OV_UV_EN on PWR (split plane): 978.62,591.61 978.62,536.52 972.94,530.83 764.76,530.83 760.56,535.03 760.56,592.74 764.76,596.94 973.3,596.94
3V3 on PWR (split plane): 226 vertices, not listed, extent 3016.56,665.56 7488.44,4584.44
no net on PWR (split plane): 7941.44,-89.34 7857.2,-89.34 7857.2,-5.2 7941.44,-5.2
5V on PWR (split plane): 161 vertices, not listed, extent 1382.72,149.41 7663.44,2624.58
GSM_PWR on PWR (split plane): 3449.44,2926.3 3399.8,2876.66 3066.99,2876.66 3064.53,2876.42 3062.18,2875.7 3060.01,2874.54 3058.1,2872.98 2995.12,2809.99 2993.56,2808.09 2992.4,2805.92 2991.68,2803.56 2991.44,2801.11 2991.44,1792 2991.68,1789.55 2992.4,1787.19 2993.56,1785.02 2995.12,1783.12 3038.32,1739.92 3040.22,1738.36 3042.39,1737.2 3044.75,1736.48 3047.2,1736.24 3143.44,1736.24 3143.44,1633.91 3143.68,1631.46 3144.4,1629.1 3145.56,1626.93 3147.12,1625.03 3179.25,1592.9 3181.15,1591.33 3183.32,1590.17 3185.68,1589.46 3188.13,1589.22 3328.71,1589.22 3352.44,1565.49 3352.44,1296.6 3352.68,1294.15 3353.4,1291.79 3354.56,1289.62 3356.12,1287.72 3392.72,1251.12 3394.62,1249.56 3396.79,1248.4 3399.15,1247.68 3401.6,1247.44 3898.8,1247.44 3920.44,1225.8 3920.44,1098.2 3894.8,1072.56 3083.2,1072.56 3042.56,1113.2 3042.56,1485 3042.32,1487.45 3041.6,1489.81 3040.44,1491.98 3038.88,1493.88 3010.88,1521.88 3008.98,1523.44 3006.81,1524.6 3004.45,1525.32 3002,1525.56 2807.56,1525.56 2807.56,2859.99 2807.32,2862.44 2806.6,2864.8 2805.44,2866.97 2803.88,2868.87 2733.11,2939.64 2731.21,2941.21 2729.04,2942.37 2726.68,2943.08 2724.23,2943.32 1389.51,2943.32 1367.56,2965.27 1367.56,3080.8 1389.2,3102.44 3075.99,3102.44 3078.44,3102.68 3080.8,3103.4 3082.97,3104.56 3084.87,3106.12 3123.5,3144.74 3125.06,3146.64 3126.22,3148.81 3126.93,3151.17 3127.17,3153.62 3127.17,3371.24 3127.17,3388.41 3162.88,3424.12 3164.44,3426.02 3165.6,3428.19 3166.32,3430.55 3166.56,3433 3166.56,3632.75 3185.17,3651.36 3449.44,3651.36
VDD_EXT on PWR (split plane): 1853.63,4381.08 1853.63,4174.87 1853.87,4172.42 1854.59,4170.06 1855.75,4167.89 1857.31,4165.99 1896.75,4126.55 1898.65,4124.99 1900.82,4123.83 1903.18,4123.12 1905.63,4122.88 2086.06,4122.88 2088.51,4123.12 2090.87,4123.83 2093.04,4124.99 2094.95,4126.55 2134.88,4166.49 2136.44,4168.39 2137.6,4170.57 2138.32,4172.92 2138.56,4175.37 2138.56,4309.98 2159.05,4330.47 2259.16,4330.47 2274.44,4315.2 2274.44,4038.91 2274.68,4036.46 2275.4,4034.11 2276.56,4031.94 2278.12,4030.03 2318.03,3990.12 2319.94,3988.56 2322.11,3987.4 2324.46,3986.68 2326.91,3986.44 2838.79,3986.44 2866.82,3958.41 2866.82,3843.62 2867.06,3841.17 2867.77,3838.82 2868.93,3836.65 2870.49,3834.74 2894.7,3810.54 2896.61,3808.97 2898.78,3807.81 2901.13,3807.1 2903.58,3806.86 3124.81,3806.86 3127.26,3807.1 3129.61,3807.81 3131.79,3808.97 3133.69,3810.54 3159.88,3836.73 3161.44,3838.63 3162.6,3840.8 3163.32,3843.16 3163.56,3845.61 3163.56,3956.46 3191.62,3984.52 3449.44,3984.52 3449.44,3676.48 3179.96,3676.48 3177.51,3676.24 3175.16,3675.52 3172.98,3674.36 3171.08,3672.8 3145.12,3646.84 3143.56,3644.93 3142.4,3642.76 3141.68,3640.41 3141.44,3637.96 3141.44,3438.2 3108.67,3405.43 2538.04,3405.43 2535.59,3405.19 2533.24,3404.48 2531.07,3403.32 2529.16,3401.75 2463.97,3336.56 974.2,3336.56 937.09,3373.67 937.09,3908.22 937.09,4305.53 937.09,4388.33 962.2,4413.44 1821.27,4413.44
5V on PWR (split plane): 3762.44,4335.21 3762.44,3914.91 3762.68,3912.46 3763.4,3910.1 3764.56,3907.93 3766.12,3906.03 3813.03,3859.12 3814.93,3857.56 3817.1,3856.4 3819.46,3855.68 3821.91,3855.44 4376.86,3855.44 4411.44,3820.86 4411.44,3440.34 4411.68,3437.89 4412.4,3435.54 4413.56,3433.37 4415.12,3431.46 4451.08,3395.5 4452.99,3393.93 4455.16,3392.77 4457.51,3392.06 4459.97,3391.82 4899.42,3391.82 5010.12,3281.12 5012.02,3279.56 5014.19,3278.4 5016.55,3277.68 5019,3277.44 5978.77,3277.44 5981.22,3277.68 5983.58,3278.4 5985.75,3279.56 5987.66,3281.12 6028.26,3321.73 6029.83,3323.63 6030.99,3325.8 6031.7,3328.16 6031.94,3330.61 6031.94,3746.71 6049.67,3764.44 6183.73,3764.44 6198.88,3749.29 6198.88,3266.84 6198.88,3258.22 6198.88,3104.32 6156.12,3061.56 4916.55,3061.56 4769.23,3208.88 4767.33,3210.44 4765.16,3211.6 4762.8,3212.32 4760.35,3212.56 4363.2,3212.56 4312.17,3263.59 4312.17,3713.63 4311.93,3716.08 4311.22,3718.44 4310.06,3720.61 4308.5,3722.51 4267.13,3763.88 4265.22,3765.44 4263.05,3766.6 4260.7,3767.32 4258.25,3767.56 3692.87,3767.56 3654.56,3805.87 3654.56,4334.15 3675.85,4355.44 3742.21,4355.44
no net on PWR (split plane): 7941.44,4668.23 7857.2,4668.23 7857.2,4752.36 7941.44,4752.36
no net on GND (split plane): -4.99,-89.34 -89.23,-89.34 -89.23,-5.2 -4.99,-5.2
no net on GND (split plane): -4.99,4668.23 -89.23,4668.23 -89.23,4752.36 -4.99,4752.36
GND on GND (split plane): 7847.01,4663.13 7847.39,4661.18 7848.5,4659.53 7850.15,4658.42 7852.1,4658.03 7941.44,4658.03 7941.44,4.99 7852.11,4.99 7850.15,4.61 7848.5,3.5 7847.4,1.85 7847.01,-0.1 7847.01,-89.34 5.2,-89.34 5.2,-0.1 4.81,1.85 3.71,3.5 2.05,4.61 0.1,4.99 -89.23,4.99 -89.23,4658.03 0.1,4658.03 2.05,4658.42 3.71,4659.53 4.81,4661.18 5.2,4663.13 5.2,4752.36 7847.01,4752.36
no net on GND (split plane): 7941.44,4668.23 7857.2,4668.23 7857.2,4752.36 7941.44,4752.36
no net on GND (split plane): 7941.44,-89.34 7857.2,-89.34 7857.2,-5.2 7941.44,-5.2